# Altium PCB Tony_Tablet.PcbDoc (part 3 of 5)
Units mm, origin at the board's own origin, x right, y up, seen from the top; angles counter-clockwise.
Board outline 136.83 x 90.55 mm, 4 copper layers (Top Layer, Power, GND, Bottom Layer), stack 0.778 mm thick; 275 components, 264 nets, 1226 pads, 0 vias.
Unrouted connection lines stored in the file: 716.
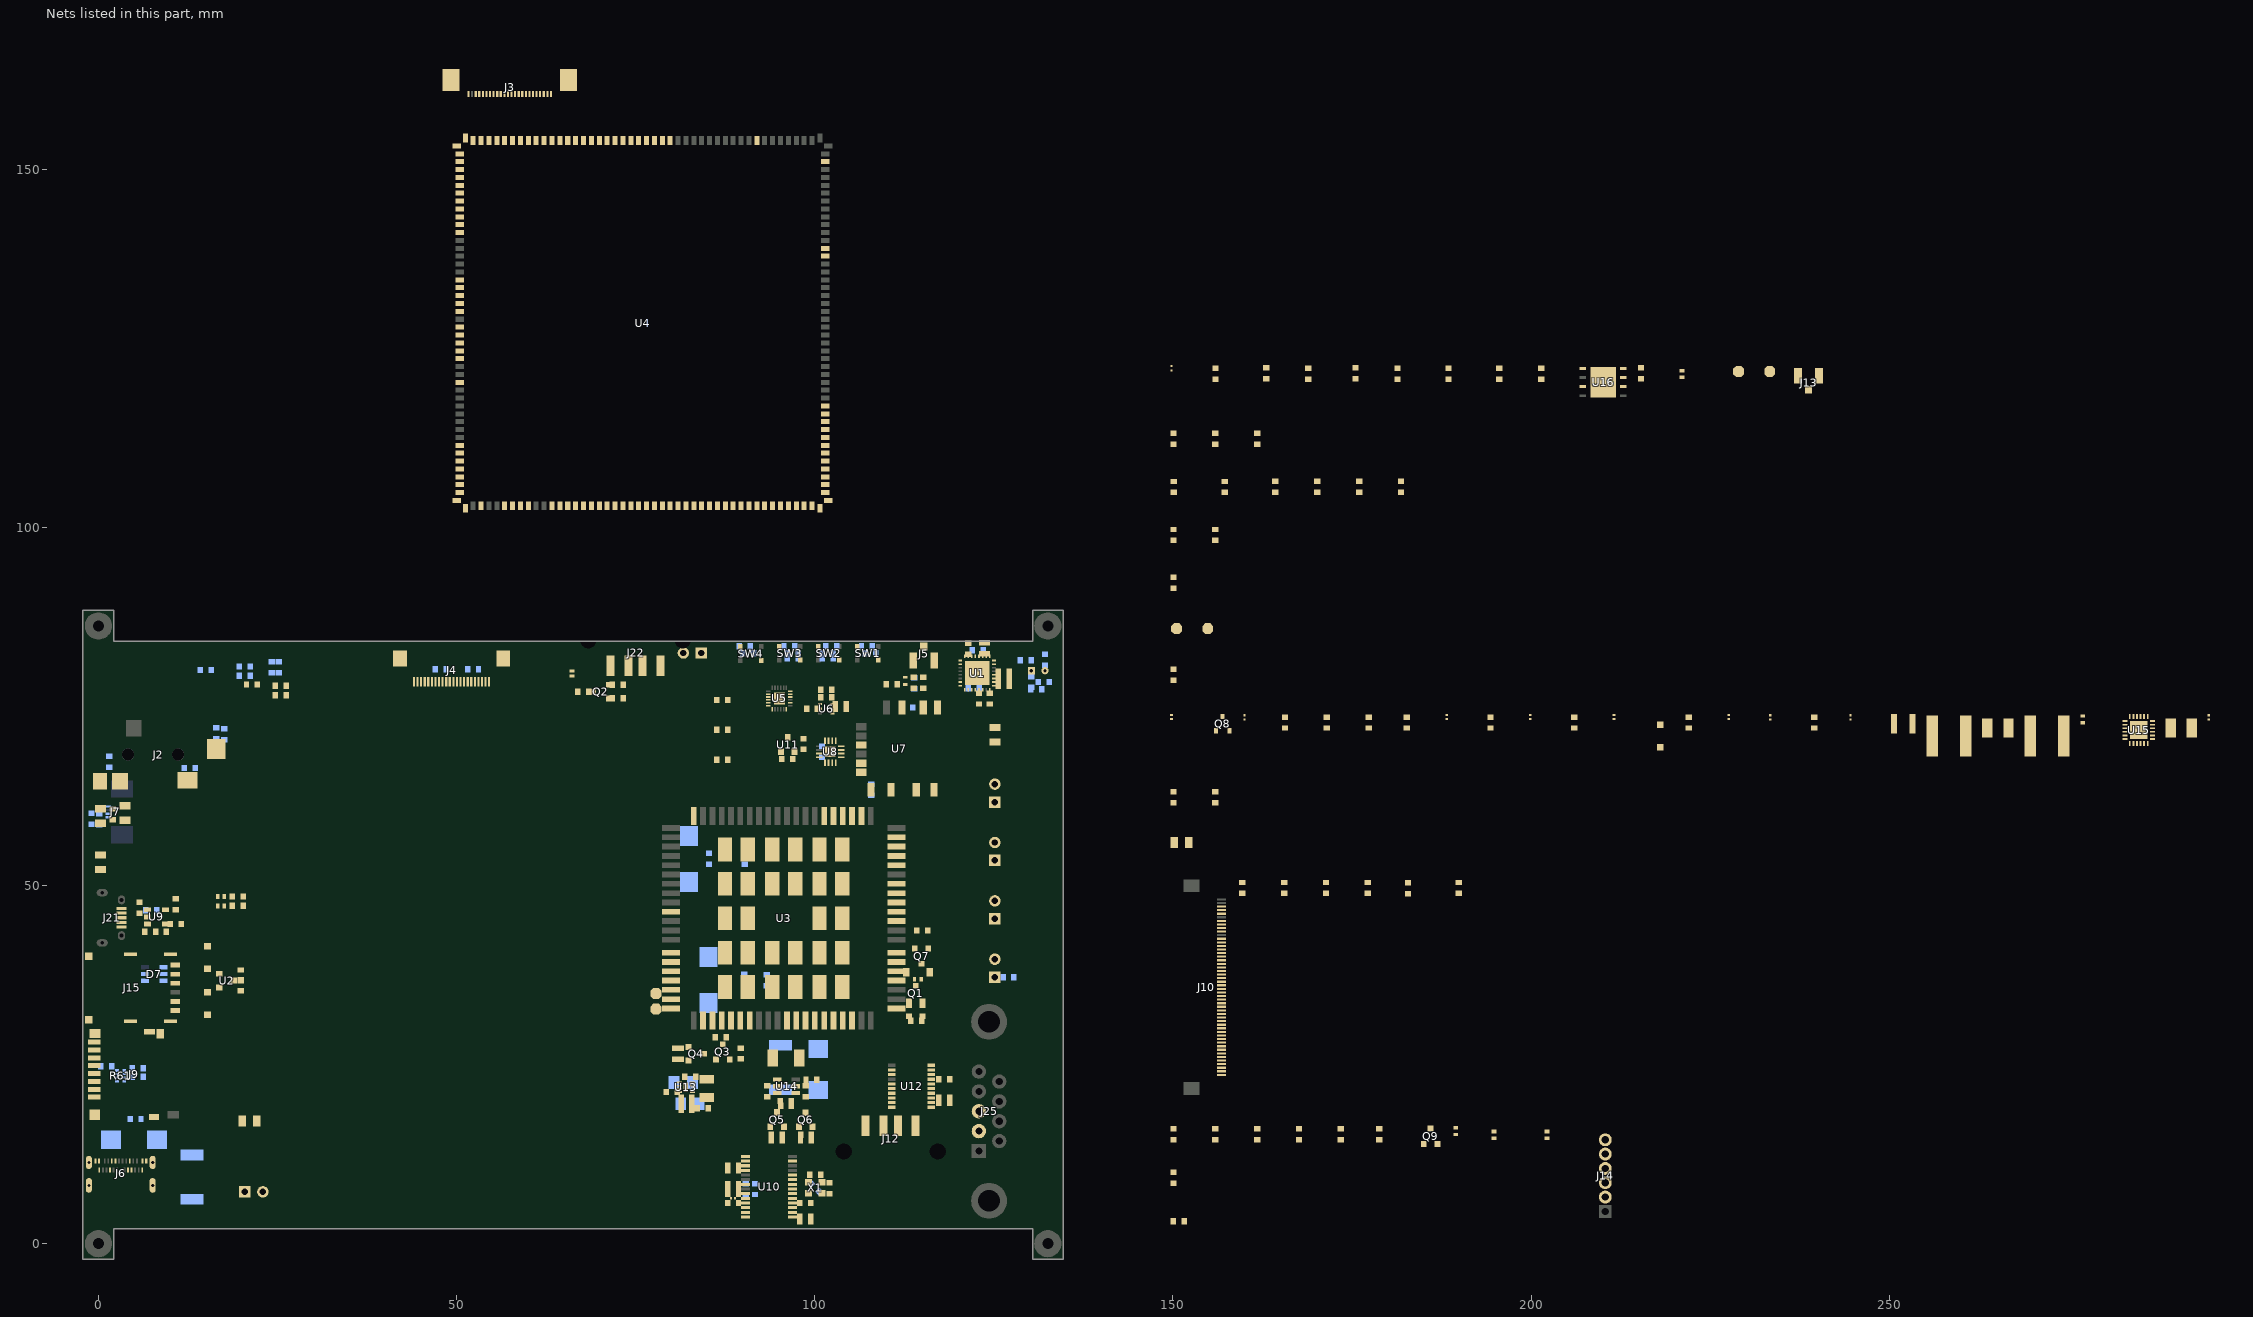
[diagram p4: the nets of this part, all layers, seen from the top]

## Part data (continued)
C84 C87: library part EMK316BBJ476ML-T, "CAP CER 47UF 16V X5R 1206", Case/Package=1206, Case Code (Metric)=3216, Manufacturer="Taiyo Yuden", Max Operating Temperature=85°C, Min Operating Temperature=-55°C, Supplier Part Number 1=587-5425-1-ND, Tolerance=20%, Voltage Rating=16V, Capacitance=47uF, Case Code (Imperial)=1206, ComponentLink1Description=http://ds.yuden.co.jp/TYCOMPAS/ut/detail.do?productNo=EMK316BBJ476ML-T&fileName=EMK316BBJ476ML-T_SS&mode=specSheetDownload&src-supplier=Digi-Key, ComponentLink1URL=http://ds.yuden.co.jp/TYCOMPAS/ut/detail.do?productNo=EMK316BBJ476ML-T&fileName=EMK316BBJ476ML-T_SS&mode=specSheetDownload&src-supplier=Digi-Key, ComponentLink2Description=http://www.farnell.com/datasheets/2819853.pdf?src-supplier=Element14, ComponentLink2URL=http://www.farnell.com/datasheets/2819853.pdf?src-supplier=Element14, ComponentLink3Description=http://www.farnell.com/datasheets/2819853.pdf?src-supplier=Farnell, ComponentLink3URL=http://www.farnell.com/datasheets/2819853.pdf?src-supplier=Farnell, ComponentLink4Description=http://www.farnell.com/datasheets/2819853.pdf?src-supplier=Newark, ComponentLink4URL=http://www.farnell.com/datasheets/2819853.pdf?src-supplier=Newark, Manufacturer Part Number=EMK316BBJ476ML-T, Mount="Surface Mount", Packaging="Tape and Reel", Pricing 1="1=0.81, 10=0.595, 100=0.408, 500=0.32304, 1000=0.27203 (USD)", Stock 1=25339, Supplier 1=Digi-Key
C86: library part CC0603JRNPO9BN220, "CAP CER 22PF 50V C0G/NPO 0603", Case Code (Imperial)=0603, Case Code (Metric)=1608, Dielectric=C0G, Insulation Resistance=10GR, Manufacturer=Yageo, Max Operating Temperature=125°C, Min Operating Temperature=-55°C, Package Quantity=1, Supplier Part Number 1=311-1062-1-ND, Temperature Coefficient=30ppm/°C, Tolerance=5%, Voltage=50V, Capacitance=22pF, Case/Package=0603, ComponentLink1Description=http://www.farnell.com/datasheets/2213336.pdf?src-supplier=Element14, ComponentLink1URL=http://www.farnell.com/datasheets/2213336.pdf?src-supplier=Element14, ComponentLink2Description=http://www.yageo.com/documents/recent/UPY-GP_NP0_16V-to-50V_16.pdf?src-supplier=Digi-Key, ComponentLink2URL=http://www.yageo.com/documents/recent/UPY-GP_NP0_16V-to-50V_16.pdf?src-supplier=Digi-Key, ComponentLink3Description=http://www.farnell.com/datasheets/1443161.pdf?src-supplier=Element14, ComponentLink3URL=http://www.farnell.com/datasheets/1443161.pdf?src-supplier=Element14, ComponentLink4Description=http://www.yageo.com/documents/recent/UPY-GP_NP0_16V-to-50V_8.pdf?src-supplier=Avnet, ComponentLink4URL=http://www.yageo.com/documents/recent/UPY-GP_NP0_16V-to-50V_8.pdf?src-supplier=Avnet, ComponentLink5Description=http://www.yageo.com/documents/recent/UPY-GP_NP0_16V-to-50V_8.pdf?src-supplier=Avnet+Europe, ComponentLink5URL=http://www.yageo.com/documents/recent/UPY-GP_NP0_16V-to-50V_8.pdf?src-supplier=Avnet+Europe, Depth=0.8mm, Height=0.8mm, Lead Free="Lead Free", Length=1.6mm, Manufacturer Part Number=CC0603JRNPO9BN220, Mount="Surface Mount", Number of Pins=2, Packaging="Tape and Reel", Pricing 1="1=0.1, 10=0.044, 100=0.0197, 500=0.0141, 1000=0.01108 (USD)", Radiation Hardening=No, REACH SVHC="No SVHC", Stock 1=221639, Supplier 1=Digi-Key, Termination=SMD/SMT, Thickness=0.035inch, Voltage Rating=50V, Voltage Rating (DC)=50V, Width=0.031inch
C90: library part T491C226K025AT, "CAP TANT 22UF 10% 25V 2312", Case/Package=Molded, Case Code (Imperial)=2412, Case Code (Metric)=6032, Dielectric Material=Tantalum, ESR (Equivalent Series Resistance)=1.4R, Leakage Current=5.5uA, Manufacturer=KEMET, Max Operating Temperature=125°C, Min Operating Temperature=-55°C, Package Quantity=1, Ripple Current=280mA, Supplier Part Number 1=399-3746-1-ND, Tolerance=10%, Voltage=25V, Capacitance=22uF, ComponentLink1Description=https://search.kemet.com/component-edge/download/datasheet/T491C226K025AT.pdf?src-supplier=Digi-Key, ComponentLink1URL=https://search.kemet.com/component-edge/download/datasheet/T491C226K025AT.pdf?src-supplier=Digi-Key, ComponentLink2Description=http://www.jameco.com/Jameco/Products/ProdDS/1573951.pdf?src-supplier=Jameco, ComponentLink2URL=http://www.jameco.com/Jameco/Products/ProdDS/1573951.pdf?src-supplier=Jameco, ComponentLink3Description=https://www.alliedelec.com/m/d/1172a60f7bb3eb66344f86e8fb9ddbde.pdf?src-supplier=Allied+Electronics, ComponentLink3URL=https://www.alliedelec.com/m/d/1172a60f7bb3eb66344f86e8fb9ddbde.pdf?src-supplier=Allied+Electronics, ComponentLink4Description=http://www.farnell.com/datasheets/1698764.pdf?src-supplier=Element14, ComponentLink4URL=http://www.farnell.com/datasheets/1698764.pdf?src-supplier=Element14, ComponentLink5Description=https://api.kemet.com/component-edge/download/datasheet/T491C226K025AT.pdf?src-supplier=Digi-Key, ComponentLink5URL=https://api.kemet.com/component-edge/download/datasheet/T491C226K025AT.pdf?src-supplier=Digi-Key, ComponentLink6Description=http://www.farnell.com/datasheets/1923792.pdf?src-supplier=Element14, ComponentLink6URL=http://www.farnell.com/datasheets/1923792.pdf?src-supplier=Element14, ComponentLink7Description=https://www.distrelec.biz/Web/Downloads/_t/ds/KEM_T2005_T491_eng_tds.pdf?mime=application%2Fpdf&src-supplier=Distrelec, ComponentLink7URL=https://www.distrelec.biz/Web/Downloads/_t/ds/KEM_T2005_T491_eng_tds.pdf?mime=application%2Fpdf&src-supplier=Distrelec, Depth=3.2mm, Dissipation Factor=6%, Features="General Purpose", Height=2.5mm, Height - Seated (Max)=0.11inch, Lead Free="Lead Free", Lead Pitch=2.9mm, Length=6mm, Life (Hours)=2000Hour, Manufacturer Part Number=T491C226K025AT, Mount="Surface Mount,PCB", Number of Pins=2, Packaging="Tape and Reel", Polarity=Polar, Pricing 1="1=0.82, 10=0.626, 100=0.4479 (USD)", Radiation Hardening=No, REACH SVHC="No SVHC", Stock 1=17993, Supplier 1=Digi-Key, Termination=SMD/SMT, Voltage Rating=25V, Voltage Rating (DC)=25V, Width=0.126inch
D1 D2: "DIODE GEN PURP 100V 300MA SOD123", Average Rectified Current=300mA, Capacitance=2pF, Current Rating=150mA, Forward Voltage=1.25V, Manufacturer=Diodes, Max Forward Surge Current (Ifsm)=2A, Max Operating Temperature=150°C, Max Repetitive Reverse Voltage (Vrrm)=100V, Min Operating Temperature=-65°C, Package Quantity=3000, Peak Reverse Current=1uA, Power Dissipation=400mW, Supplier Part Number 1=1N4148W-FDICT-ND, Voltage Rating (DC)=75V, ComponentLink1Description=https://www.diodes.com/assets/Datasheets/ds30086.pdf?src-supplier=Digi-Key, ComponentLink1URL=https://www.diodes.com/assets/Datasheets/ds30086.pdf?src-supplier=Digi-Key, ComponentLink2Description=http://www.farnell.com/datasheets/2238378.pdf?src-supplier=Element14, ComponentLink2URL=http://www.farnell.com/datasheets/2238378.pdf?src-supplier=Element14, ComponentLink3Description=http://www.mouser.com/ds/2/115/ds30086-60872.pdf?src-supplier=Mouser, ComponentLink3URL=http://www.mouser.com/ds/2/115/ds30086-60872.pdf?src-supplier=Mouser, ComponentLink4Description=https://www.diodes.com/assets/Datasheets/ds30086.pdf?src-supplier=Avnet, ComponentLink4URL=https://www.diodes.com/assets/Datasheets/ds30086.pdf?src-supplier=Avnet, ComponentLink5Description=https://www.diodes.com/assets/Datasheets/ds30086.pdf?src-supplier=Avnet+Europe, ComponentLink5URL=https://www.diodes.com/assets/Datasheets/ds30086.pdf?src-supplier=Avnet+Europe, ComponentLink6Description=https://www.diodes.com/assets/Datasheets/ds30086.pdf?src-supplier=Verical, ComponentLink6URL=https://www.diodes.com/assets/Datasheets/ds30086.pdf?src-supplier=Verical, Contact Plating=Tin,Matte, Element Configuration=Single, Forward Current=150mA, Height=1.25mm, Lead Free="Lead Free", Length=2.85mm, Manufacturer Part Number=1N4148W-7-F, Max Reverse Voltage (DC)=100V, Max Surge Current=2A, Mount="Surface Mount", Number of Pins=2, Output Current=150mA, Packaging="Tape and Reel", Peak Non-Repetitive Surge Current=2A, Polarity=Standard, Power Rating=400mW, Pricing 1="1=0.16, 10=0.146, 25=0.1388, 100=0.0611, 250=0.05868, 500=0.048, 1000=0.03333 (USD)", Radiation Hardening=No, REACH SVHC="No SVHC", Recovery Time=4ns, Reverse Recovery Time=4ns, Stock 1=3949286, Supplier 1=Digi-Key, Voltage=100V, Weight=0.000353oz, Width=1.7mm
D3: "5.1V 800mW 5uA @ 1V SOD-123FL Zener Diodes RoHS", Manufacturer="PANJIT International", Package=SOD-123FL, Manufacturer Part No=BZD27C5V1P_R1_00001
D4: "Bidirectional 3.3V (Max) 3.8V 8V 10A (8/20us) SMD TVS RoHS", Manufacturer="Bourne Semicon (Shenzhen)", Package=DFN1006, ComponentLink1Description=https://www.mouser.com/ds/2/302/PESD3V3X1BL-64229.pdf?src-supplier=Mouser, ComponentLink1URL=https://www.mouser.com/ds/2/302/PESD3V3X1BL-64229.pdf?src-supplier=Mouser, ComponentLink2Description=https://assets.nexperia.com/documents/data-sheet/PESD3V3X1BL.pdf?src-supplier=Digi-Key, ComponentLink2URL=https://assets.nexperia.com/documents/data-sheet/PESD3V3X1BL.pdf?src-supplier=Digi-Key, ComponentLink3Description=http://www.onsemi.cn/pub_link/Collateral/ESD9B-D.PDF?src-supplier=Digi-Key, ComponentLink3URL=http://www.onsemi.cn/pub_link/Collateral/ESD9B-D.PDF?src-supplier=Digi-Key, ComponentLink4Description=http://www.onsemi.com/pub/Collateral/ESD9B-D.PDF?src-supplier=Avnet+Europe, ComponentLink4URL=http://www.onsemi.com/pub/Collateral/ESD9B-D.PDF?src-supplier=Avnet+Europe, ComponentLink5Description=http://www.mouser.com/ds/2/308/ESD9B-D-479788.pdf?src-supplier=Mouser, ComponentLink5URL=http://www.mouser.com/ds/2/308/ESD9B-D-479788.pdf?src-supplier=Mouser, ComponentLink6Description=http://www.farnell.com/datasheets/1596367.pdf?src-supplier=Element14, ComponentLink6URL=http://www.farnell.com/datasheets/1596367.pdf?src-supplier=Element14, ComponentLink7Description=https://www.verical.com/server-webapp/html/getDatasheet?partID=292713&src-supplier=Verical, ComponentLink7URL=https://www.verical.com/server-webapp/html/getDatasheet?partID=292713&src-supplier=Verical, ComponentLink8Description=http://www.onsemi.com/pub/Collateral/ESD9B-D.PDF?src-supplier=Avnet, ComponentLink8URL=http://www.onsemi.com/pub/Collateral/ESD9B-D.PDF?src-supplier=Avnet, Manufacturer Part No=ESD9B3.3ST5G-N
D5: "Diode Schottky 30V 0.35A 2-Pin SOD-123 T/R", Average Rectified Current=350mA, Forward Voltage=600mV, Manufacturer=Diodes, Max Forward Surge Current (Ifsm)=1.5A, Max Operating Temperature=125°C, Max Power Dissipation=400mW, Max Repetitive Reverse Voltage (Vrrm)=30V, Max Reverse Current=5uA, Min Operating Temperature=-65°C, Package Quantity=3000, Supplier Part Number 1=SD103BW-7-FDICT-ND, Category="Rectifier Diodes", ComponentLink1Description=https://datasheet.ciiva.com/36526/1541925-36526008.pdf?src-supplier=Jameco, ComponentLink1URL=https://datasheet.ciiva.com/36526/1541925-36526008.pdf?src-supplier=Jameco, ComponentLink2Description=https://datasheet.ciiva.com/912/ds11013-912934.pdf?src-supplier=Digi-Key, ComponentLink2URL=https://datasheet.ciiva.com/912/ds11013-912934.pdf?src-supplier=Digi-Key, ComponentLink3Description=https://datasheet.ciiva.com/912/ds11013-912935.pdf?src-supplier=Digi-Key, ComponentLink3URL=https://datasheet.ciiva.com/912/ds11013-912935.pdf?src-supplier=Digi-Key, ComponentLink4Description=https://datasheet.ciiva.com/16574/ds11013-16574365.pdf?src-supplier=Avnet+Europe, ComponentLink4URL=https://datasheet.ciiva.com/16574/ds11013-16574365.pdf?src-supplier=Avnet+Europe, ComponentLink5Description=https://datasheet.ciiva.com/22695/480042-22695847.pdf?src-supplier=Element14, ComponentLink5URL=https://datasheet.ciiva.com/22695/480042-22695847.pdf?src-supplier=Element14, ComponentLink6Description=https://datasheet.ciiva.com/7964/ds11013-7964329.pdf?src-supplier=Element14, ComponentLink6URL=https://datasheet.ciiva.com/7964/ds11013-7964329.pdf?src-supplier=Element14, Element Configuration=Single, Forward Current=350mA, Height=1.25mm, Lead Free="Lead Free", Length=2.85mm, Manufacturer Part Number=SD103BW-7-F, Max Reverse Voltage (DC)=30V, Mount="Surface Mount", Number of Pins=2, Packaging="Tape and Reel", Peak Non-Repetitive Surge Current=1.5A, Power Dissipation=400mW, Power Rating=400mW, Pricing 1="1=0.44000, 10=0.32400, 100=0.18340, 500=0.12144, 1000=0.09310 (USD)", Radiation Hardening=No, REACH SVHC="No SVHC", Reverse Recovery Time=10ns, RoHS=Yes, RoHS Compliant=Yes, Series=-, Stock 1=2033, Supplier 1=Digi-Key, Termination=SMD/SMT, Weight=0.000353oz, Width=1.7mm
D6 D12: "DIODE SCHOTTKY 40V 3A DO214AB", Average Rectified Current=3A, Case/Package=SMC, Forward Voltage=500mV, Manufacturer="Vishay Semiconductors", Max Forward Surge Current (Ifsm)=100A, Max Operating Temperature=125°C, Max Repetitive Reverse Voltage (Vrrm)=40V, Max Reverse Current=500uA, Min Operating Temperature=-55°C, Package Quantity=1, Category="Rectifier Diodes", Contact Plating=Tin,Matte, Current=3A, Current Rating=3A, Element Configuration=Single, Forward Current=3A, Height=2.417mm, Lead Free="Lead Free", Length=7.11mm, Manufacturer Part Number=SS34-E3/57T, Max Reverse Leakage Current=500uA, Max Reverse Voltage (DC)=40V, Max Surge Current=100A, Mount="Surface Mount", Number of Pins=2, Output Current=3A, Packaging="Tape and Reel", Peak Non-Repetitive Surge Current=100A, Polarity=Standard, Pricing 1="850=0.23754, 1700=0.19495, 3400=0.19341, 5100=0.19188, 6800=0.19034, 8500=0.18881, 85000=0.18727 (USD)", Radiation Hardening=No, REACH SVHC=Unknown, RoHS=Yes, Stock 1=850, Supplier 1=Avnet, Supplier Part Number 1=SS34-E3/57T, Voltage=40V, Voltage Rating (DC)=40V, Width=6.22mm
D7: "TVS DIODE 3V SOT23-6", Breakdown Voltage=6.1V, Capacitance=50pF, Case/Package=SOT-23, Clamping Voltage=11.35V, Leakage Current=1uA, Manufacturer=STMicroelectronics, Max Breakdown Voltage=7.2V, Max Operating Temperature=125°C, Max Power Dissipation=100W, Min Operating Temperature=-40°C, Operating Supply Voltage=3V, Package Quantity=1, Peak Pulse Current=15A, Power Line Protection=No, Resistor Type=Zener, Supplier Part Number 1=497-7747-1-ND, Test Current=1mA, Category="TVS Diodes", ComponentLink1Description=https://datasheet.ciiva.com/5782/453742-5782854.pdf?src-supplier=Farnell, ComponentLink1URL=https://datasheet.ciiva.com/5782/453742-5782854.pdf?src-supplier=Farnell, ComponentLink2Description=https://datasheet.ciiva.com/15143/getdatasheetpartid-146092-15143750.pdf?src-supplier=Verical, ComponentLink2URL=https://datasheet.ciiva.com/15143/getdatasheetpartid-146092-15143750.pdf?src-supplier=Verical, ComponentLink3Description=https://datasheet.ciiva.com/16210/cd00005102-16210854.pdf?src-supplier=Future+Electronics, ComponentLink3URL=https://datasheet.ciiva.com/16210/cd00005102-16210854.pdf?src-supplier=Future+Electronics, ComponentLink4Description=https://datasheet.ciiva.com/14161/esda6v1l-st-eng-tds-14161530.pdf?src-supplier=Distrelec, ComponentLink4URL=https://datasheet.ciiva.com/14161/esda6v1l-st-eng-tds-14161530.pdf?src-supplier=Distrelec, ComponentLink5Description=https://datasheet.ciiva.com/4507/cd00005102-58005-4507934.pdf?src-supplier=Mouser, ComponentLink5URL=https://datasheet.ciiva.com/4507/cd00005102-58005-4507934.pdf?src-supplier=Mouser, ComponentLink6Description=https://datasheet.ciiva.com/338/cd00005102-338720.pdf?src-supplier=Digi-Key, ComponentLink6URL=https://datasheet.ciiva.com/338/cd00005102-338720.pdf?src-supplier=Digi-Key, ComponentLink7Description=https://datasheet.ciiva.com/22695/453742-22695670.pdf?src-supplier=Element14, ComponentLink7URL=https://datasheet.ciiva.com/22695/453742-22695670.pdf?src-supplier=Element14, ComponentLink8Description=https://datasheet.ciiva.com/7662/453742-7662123.pdf?src-supplier=Element14, ComponentLink8URL=https://datasheet.ciiva.com/7662/453742-7662123.pdf?src-supplier=Element14, ComponentLink9Description=https://datasheet.ciiva.com/1276/453742-1276863.pdf?src-supplier=Element14, ComponentLink9URL=https://datasheet.ciiva.com/1276/453742-1276863.pdf?src-supplier=Element14, ComponentLink10Description=https://datasheet.ciiva.com/41443/001184254-da-01-en-transil-array-esda6v1-5sc6-sot-23-6-stm-41443467.pdf?src-supplier=Conrad, ComponentLink10URL=https://datasheet.ciiva.com/41443/001184254-da-01-en-transil-array-esda6v1-5sc6-sot-23-6-stm-41443467.pdf?src-supplier=Conrad, Depth=1.75mm, Diode Type=ZENER, Direction=Unidirectional, Element Configuration="Common Anode", ESD Protection=Yes, Height=1.3mm, Lead Free="Lead Free", Length=3.05mm, Manufacturer Part Number=ESDA6V1-5SC6, Max Reverse Leakage Current=1uA, Min Breakdown Voltage=6.1V, Mount="Surface Mount", Number of Channels=5, Number of Elements=5, Number of Pins=6, Number of Unidirectional Channels=5, Packaging="Tape and Reel", Peak Pulse Power=100W, Polarity=Unidirectional, Pricing 1="1=0.46000, 10=0.39400, 100=0.27370, 500=0.21368, 1000=0.17378 (USD)", Radiation Hardening=No, REACH SVHC="No SVHC", Reverse Breakdown Voltage=6.1V, Reverse Standoff Voltage=3V, RoHS=Yes, RoHS Compliant=Yes, Series="ESDA, TRANSIL™", Stock 1=10768, Supplier 1=Digi-Key, Termination=SMD/SMT, Voltage Rating (DC)=6.1V, Width=1.75mm, Working Voltage=3V
J1 J8 J11 J26: library part "SMD PAD"
J2: "CONN JACK 4COND 3.5MM SMD R/A", Body Color=Black, Case/Package=SMD/SMT, Current Rating=1A, Manufacturer=CUI, Supplier Part Number 1=CP-43515TSSJCT-ND, Category=Connectors, Color=Black, ComponentLink1Description=https://datasheet.ciiva.com/7368/sj-4351x-smt-series-7368789.pdf?src-supplier=Digi-Key, ComponentLink1URL=https://datasheet.ciiva.com/7368/sj-4351x-smt-series-7368789.pdf?src-supplier=Digi-Key, ComponentLink2Description=https://datasheet.ciiva.com/7368/sj-4351x-smt-series-7368776.pdf?src-supplier=Digi-Key, ComponentLink2URL=https://datasheet.ciiva.com/7368/sj-4351x-smt-series-7368776.pdf?src-supplier=Digi-Key, ComponentLink3Description=https://datasheet.ciiva.com/16215/sj-4351x-smt-series-16215052.pdf?src-supplier=Future+Electronics, ComponentLink3URL=https://datasheet.ciiva.com/16215/sj-4351x-smt-series-16215052.pdf?src-supplier=Future+Electronics, Connector Type=Jack, Contact Plating=Silver, Gender=Female, Lead Free="Lead Free", Manufacturer Part Number=SJ-43515TS-SMT-TR, Mount="Surface Mount", Number of Conductors=4, Number of Ports=1, Orientation=Horizontal, Packaging="Cut Tape", Pricing 1="1=1.07000, 10=0.90600, 25=0.86960, 50=0.85100, 100=0.81400, 250=0.74000, 500=0.66600 (USD)", RoHS=Yes, RoHS Compliant=Yes, Series=SJ, Shielding=Unshielded, Stock 1=51087, Supplier 1=Digi-Key, Termination=Solder
J3: "CONN FFC TOP 24POS 0.50MM R/A", Current Rating=500mA, Manufacturer=Molex, Manufacturer Part Number=52435-2471, Max Operating Temperature=85°C, Max Voltage Rating (AC)=50V, Max Voltage Rating (DC)=5.05kV, Min Operating Temperature=-40°C, Package Quantity=1000, Supplier Part Number 1=WM7975CT-ND, Category="FFC / FPC", ComponentLink1Description=https://datasheet.ciiva.com/1484/1629121-1484657.pdf?src-supplier=Newark, ComponentLink1URL=https://datasheet.ciiva.com/1484/1629121-1484657.pdf?src-supplier=Newark, ComponentLink2Description=https://datasheet.ciiva.com/5137/0524352471-ffc-fpc-connectors-170593-5137745.pdf?src-supplier=Mouser, ComponentLink2URL=https://datasheet.ciiva.com/5137/0524352471-ffc-fpc-connectors-170593-5137745.pdf?src-supplier=Mouser, ComponentLink3Description=https://datasheet.ciiva.com/30088/283130524352471-ffc-fpc-nectors-30088679.pdf?src-supplier=Onlinecomponents.com, ComponentLink3URL=https://datasheet.ciiva.com/30088/283130524352471-ffc-fpc-nectors-30088679.pdf?src-supplier=Onlinecomponents.com, ComponentLink4Description=https://datasheet.ciiva.com/3925/128320524352471-ffc-fpc-nectors-3925353.pdf?src-supplier=Arrow+Electronics, ComponentLink4URL=https://datasheet.ciiva.com/3925/128320524352471-ffc-fpc-nectors-3925353.pdf?src-supplier=Arrow+Electronics, ComponentLink5Description=https://datasheet.ciiva.com/16659/0524352471-ffc-fpc-connectors-16659957.pdf?src-supplier=Avnet+Europe, ComponentLink5URL=https://datasheet.ciiva.com/16659/0524352471-ffc-fpc-connectors-16659957.pdf?src-supplier=Avnet+Europe, ComponentLink6Description=https://datasheet.ciiva.com/8038/1597798-8038390.pdf?src-supplier=Element14, ComponentLink6URL=https://datasheet.ciiva.com/8038/1597798-8038390.pdf?src-supplier=Element14, ComponentLink7Description=https://datasheet.ciiva.com/10364/0524352471-ffc-fpc-connectors-10364236.pdf?src-supplier=Avnet, ComponentLink7URL=https://datasheet.ciiva.com/10364/0524352471-ffc-fpc-connectors-10364236.pdf?src-supplier=Avnet, Contact Location=Top, Contact Material=Bronze, Contact Plating=Gold, Depth=4.7mm, Gender=Receptacle, Housing Material=Nylon, Length=18.6mm, Number of Circuits=24, Number of Contacts=24, Number of Positions=24, Number of Rows=1, Orientation="Right Angle", Packaging="Tape and Reel", Pitch=0.5mm, Pricing 1="1=2.22000, 10=1.89200, 100=1.56290 (USD)", Radiation Hardening=No, REACH SVHC=Unknown, RoHS=Yes, Stackable=No, Stock 1=1377, Supplier 1=Digi-Key, Termination=Solder, Voltage Rating=50V
J4: "CONN FFC 22POS 0.50MM SMD", Manufacturer=Hirose, Supplier Part Number 1=26-TF31-22S-0.5SH(800)CT-ND, Manufacturer Part Number=TF31-22S-0.5SH(800), Pricing 1="1=0.46000, 10=0.43100, 25=0.36920, 50=0.31360, 100=0.30140, 250=0.27060, 500=0.25830, 1000=0.21525 (USD)", RoHS=Yes, RoHS Compliant=No, Stock 1=14399, Supplier 1=Digi-Key
J5 J13: "CONN U.FL RCPT STR 50 OHM SMD", Case/Package=SMD/SMT, Manufacturer=Hirose, Package Quantity=10000, Supplier Part Number 1=U.FL-R-SMT-1(80)-CUTT, ComponentLink1Description=https://www.hirose.com/product/en/download_file/key_name/U.FL-R-SMT-1%2880%29/category/Specification%20Sheet/doc_file_id/37638/?file_category_id=9&item_id=03310472280&is_series=&src-supplier=Digi-Key, ComponentLink1URL=https://www.hirose.com/product/en/download_file/key_name/U.FL-R-SMT-1%2880%29/category/Specification%20Sheet/doc_file_id/37638/?file_category_id=9&item_id=03310472280&is_series=&src-supplier=Digi-Key, ComponentLink2Description=http://www.mouser.com/ds/2/185/U.FL_catalog-939761.pdf?src-supplier=Mouser, ComponentLink2URL=http://www.mouser.com/ds/2/185/U.FL_catalog-939761.pdf?src-supplier=Mouser, Lead Free="Lead Free", Manufacturer Part Number=U.FL-R-SMT-1(80), Packaging="Tape and Reel", Pricing 1="1=1.07, 500=0.785, 1500=0.74, 2500=0.72, 5000=0.695 (USD)", Stock 1=1272, Supplier 1="Future Electronics"
J6: "CONN RCP USB3.1 TYPEC 24P SMD RA", Current Rating=1.25A, Flammability Rating="UL94 V-0", Insulation Color=Black, Manufacturer="TE Connectivity AMP", Max Operating Temperature=85°C, Min Operating Temperature=-40°C, Ratings=Waterproof, Supplier Part Number 1=A132569CT-ND, Voltage Rating=30V, Category="USB Connectors", ComponentLink1Description=http://www.farnell.com/datasheets/2611889.pdf?src-supplier=Farnell, ComponentLink1URL=http://www.farnell.com/datasheets/2611889.pdf?src-supplier=Farnell, ComponentLink2Description=https://www.te.com/commerce/DocumentDelivery/DDEController?Action=srchrtrv&DocNm=2305018&DocType=Customer+Drawing&DocLang=English&src-supplier=Digi-Key, ComponentLink2URL=https://www.te.com/commerce/DocumentDelivery/DDEController?Action=srchrtrv&DocNm=2305018&DocType=Customer+Drawing&DocLang=English&src-supplier=Digi-Key, ComponentLink3Description=http://www.farnell.com/datasheets/2611889.pdf?src-supplier=Newark, ComponentLink3URL=http://www.farnell.com/datasheets/2611889.pdf?src-supplier=Newark, Connector Type=USB, Contact Plating=Gold, Gender=Receptacle, Manufacturer Part Number=2305018-2, Mount="Surface Mount,Through Hole", Number of Contacts=24, Number of Ports=1, Packaging="Tape and Reel", Pricing 1="1=3.00000, 10=2.87800, 25=2.63840, 50=2.51840, 100=2.39840, 250=2.09864 (USD)", RoHS=Yes, RoHS Compliant=Yes, Shielding=Shielded, Stock 1=4590, Supplier 1=Digi-Key, Termination=Solder
J7: "CONN FFC BOTTOM 4POS 0.50MM R/A", Actuator Color=Brown, Contact Resistance=20mR, Current Rating=500mA, Flammability Rating="UL94 V-0", Housing Color=Natural, Manufacturer=Molex, Manufacturer Part Number=52746-0471, Max Operating Temperature=85°C, Min Operating Temperature=-20°C, Package Quantity=1, Supplier Part Number 1=WM6768CT-ND, Voltage Rating=50V, Actuator Material=Glass,Polyphenylene, Category="FFC / FPC", ComponentLink1Description=https://datasheet.ciiva.com/8038/1597791-8038563.pdf?src-supplier=Element14, ComponentLink1URL=https://datasheet.ciiva.com/8038/1597791-8038563.pdf?src-supplier=Element14, ComponentLink2Description=https://datasheet.ciiva.com/11745/0900766b80dfdcc6-11745365.pdf?src-supplier=RSComponents, ComponentLink2URL=https://datasheet.ciiva.com/11745/0900766b80dfdcc6-11745365.pdf?src-supplier=RSComponents, ComponentLink3Description=https://datasheet.ciiva.com/15176/getdatasheetpartid-367391-15176714.pdf?src-supplier=Verical, ComponentLink3URL=https://datasheet.ciiva.com/15176/getdatasheetpartid-367391-15176714.pdf?src-supplier=Verical, Contact Location=Bottom, Contact Material=Bronze, Contact Plating=Gold, Depth=4.3mm, Gender=Receptacle, Housing Material=Nylon, Length=8.1mm, Mating Cycles=20, Mount="Surface Mount", Number of Contacts=4, Number of Positions=4, Number of Rows=1, Orientation="Right Angle", Packaging="Tape and Reel", Pitch=0.5mm, Pricing 1="1=0.76000, 10=0.64000, 100=0.49810 (USD)", Radiation Hardening=No, REACH SVHC=Unknown, RoHS=Yes, RoHS Compliant=Yes, Series="Easy-On™ 52746", Stock 1=213, Supplier 1=Digi-Key, Termination=Solder, Wire/Cable Type=Straight
J9: "CONN MICRO SD CARD PUSH-PULL R/A", Manufacturer="AMPHENOL ICC (COMMERCIAL PRODUCTS)", Supplier Part Number 1=114-00841-68-6-ND, Connector Type=Connector, Contact Plating=Gold, Manufacturer Part Number=114-00841-68, Mount="Surface Mount", Packaging="Tape and Reel", Pricing 1="1=1.32, 10=1.194, 25=1.1208, 50=1.0722, 100=1.0235, 250=0.926, 500=0.8529 (USD)", Stock 1=29968, Supplier 1=Digi-Key
J10: "Conn FFC/FPC 50 POS 0.5mm  SMD T/R", Color=Beige,Brown, Contact Resistance=50mR, Current Rating=500mA, Flammability Rating="UL94 V-0", Housing Color=Beige, Insulation Resistance=500MR, Manufacturer=Hirose, Max Current Rating=400mA, Max Operating Temperature=70°C, Max Voltage Rating (AC)=50V, Min Operating Temperature=-40°C, Package Quantity=2000, Supplier Part Number 1=HFK150CT-ND, Actuator Material=Polyphenylene, Category="FFC / FPC", ComponentLink1Description=https://datasheet.ciiva.com/14667/0900766b80806912-14667338.pdf?src-supplier=RSComponents, ComponentLink1URL=https://datasheet.ciiva.com/14667/0900766b80806912-14667338.pdf?src-supplier=RSComponents, ComponentLink2Description=https://datasheet.ciiva.com/11745/0900766b80d985fc-11745058.pdf?src-supplier=RSComponents, ComponentLink2URL=https://datasheet.ciiva.com/11745/0900766b80d985fc-11745058.pdf?src-supplier=RSComponents, ComponentLink3Description=https://datasheet.ciiva.com/15176/getdatasheetpartid-447852-15176863.pdf?src-supplier=Verical, ComponentLink3URL=https://datasheet.ciiva.com/15176/getdatasheetpartid-447852-15176863.pdf?src-supplier=Verical, ComponentLink4Description=https://datasheet.ciiva.com/7989/58809-7989413.pdf?src-supplier=Element14, ComponentLink4URL=https://datasheet.ciiva.com/7989/58809-7989413.pdf?src-supplier=Element14, ComponentLink5Description=https://datasheet.ciiva.com/5137/ed-fh12-20140305-355586-5137621.pdf?src-supplier=Mouser, ComponentLink5URL=https://datasheet.ciiva.com/5137/ed-fh12-20140305-355586-5137621.pdf?src-supplier=Mouser, Contact Location=Top, Contact Material=Bronze, Contact Plating=Gold, Depth=6.2mm, Gender=Female, Housing Material=Polyamide, Lead Free="Lead Free", Lead Pitch=0.5mm, Length=29.5mm, Manufacturer Part Number=FH12A-50S-0.5SH(55), Material=Polyamide, Mating Cycles=20, Mount="Surface Mount", Number of Contacts=50, Number of Positions=50, Number of Rows=1, Orientation="Right Angle", Packaging="Tape and Reel", Pitch=0.5mm, Pricing 1="1=3.00000, 10=2.88000, 25=2.64000, 50=2.52000, 100=2.40000, 250=2.10000, 500=2.04000, 1000=1.74000 (USD)", Radiation Hardening=No, REACH SVHC="No SVHC", RoHS=Yes, Supplier 1=Digi-Key, Termination=Solder, Voltage Rating=50V, Voltage Rating (AC)=50V, Width=29.1mm, Wire/Cable Type=Straight
J12 J22: "USB Connectors 4P RECEPTACLE TYPE A", Color=White, Contact Resistance=30mR, Current Rating=1A, Flammability Rating="UL94 V-0", Insulation Resistance=1GR, Manufacturer="Amphenol FCI", Max Operating Temperature=40°C, Min Operating Temperature=0°C, Package Quantity=42, Supplier Part Number 1=70236897, Body Plating=Nickel, Category=Connectors, ComponentLink1Description=https://datasheet.ciiva.com/851/87583-851211.pdf?src-supplier=Digi-Key, ComponentLink1URL=https://datasheet.ciiva.com/851/87583-851211.pdf?src-supplier=Digi-Key, ComponentLink2Description=https://datasheet.ciiva.com/1100/57319-1100818.pdf?src-supplier=Newark, ComponentLink2URL=https://datasheet.ciiva.com/1100/57319-1100818.pdf?src-supplier=Newark, ComponentLink3Description=https://datasheet.ciiva.com/25614/0900766b8118e6e2-25614557.pdf?src-supplier=RSComponents, ComponentLink3URL=https://datasheet.ciiva.com/25614/0900766b8118e6e2-25614557.pdf?src-supplier=RSComponents, ComponentLink4Description=https://datasheet.ciiva.com/4599/gs-12-095-532824-4599287.pdf?src-supplier=Mouser, ComponentLink4URL=https://datasheet.ciiva.com/4599/gs-12-095-532824-4599287.pdf?src-supplier=Mouser, ComponentLink5Description=https://datasheet.ciiva.com/15181/getdatasheetpartid-106468-15181159.pdf?src-supplier=Verical, ComponentLink5URL=https://datasheet.ciiva.com/15181/getdatasheetpartid-106468-15181159.pdf?src-supplier=Verical, ComponentLink6Description=https://datasheet.ciiva.com/3094/87583-3094440.pdf?src-supplier=Avnet, ComponentLink6URL=https://datasheet.ciiva.com/3094/87583-3094440.pdf?src-supplier=Avnet, ComponentLink7Description=https://datasheet.ciiva.com/14619/70236897-14619037.pdf?src-supplier=Allied+Electronics, ComponentLink7URL=https://datasheet.ciiva.com/14619/70236897-14619037.pdf?src-supplier=Allied+Electronics, Connector Type=USB,Receptacle, Contact Material="Copper Alloy", Contact Plating=GXT,Gold, Depth=14mm, Gender=Receptacle, Housing Material=Thermoplastic, Interface=USB, Length=14.5mm, Manufacturer Part Number=87583-2010BLF, Material=Tin, Mating Cycles=1500, Mount="Surface Mount,Horizontal", Number of Contacts=4, Number of Ports=1, Number of Positions=4, Number of Terminals/Pins=4, Orientation="Right Angle", Packaging=Rail/Tube, Plating=Nickel, Radiation Hardening=No, REACH SVHC="No SVHC", RoHS=Yes, RoHS Compliant=Yes, Series=87583, Supplier 1="Allied Electronics", Termination=Solder, USB Standard="USB 2.0"
J14: "CONN HEADER VERT 6POS 2MM", Color=Natural, Contact Resistance=20mR, Current Rating=2A, Housing Color=White, Insulation Resistance=1MR, Manufacturer=JST, Max Operating Temperature=85°C, Max Voltage Rating (AC)=100V, Min Operating Temperature=-25°C, Supplier Part Number 1=455-1708-ND, Category=Connectors, ComponentLink1Description=https://datasheet.ciiva.com/11747/0900766b8082f554-11747368.pdf?src-supplier=RSComponents, ComponentLink1URL=https://datasheet.ciiva.com/11747/0900766b8082f554-11747368.pdf?src-supplier=RSComponents, ComponentLink2Description=https://datasheet.ciiva.com/712/eph-712563.pdf?src-supplier=Digi-Key, ComponentLink2URL=https://datasheet.ciiva.com/712/eph-712563.pdf?src-supplier=Digi-Key, ComponentLink3Description=https://datasheet.ciiva.com/26894/getdatasheetpartid-639917-26894487.pdf?src-supplier=Verical, ComponentLink3URL=https://datasheet.ciiva.com/26894/getdatasheetpartid-639917-26894487.pdf?src-supplier=Verical, ComponentLink4Description=https://datasheet.ciiva.com/20207/523648-20207241.pdf?src-supplier=Rapid+Electronics, ComponentLink4URL=https://datasheet.ciiva.com/20207/523648-20207241.pdf?src-supplier=Rapid+Electronics, ComponentLink5Description=https://datasheet.ciiva.com/8052/80560-8052027.pdf?src-supplier=Element14, ComponentLink5URL=https://datasheet.ciiva.com/8052/80560-8052027.pdf?src-supplier=Element14, Connector Type="Male Pin", Contact Material=Tin,Brass, Contact Mating Length=0.13inch, Contact Plating=Tin,Copper, Depth=4.5mm, Fastening Type=Detent, Gender=Male, Height=9.4mm, Housing Material=Polyamide, Lead Free="Lead Free", Lead Pitch=2mm, Length=13.9mm, Manufacturer Part Number=B6B-PH-K-S(LF)(SN), Max Current Rating=2A, Mount="Through Hole", Number of Contacts=6, Number of Pins=6, Number of Poles=6, Number of Positions=6, Number of Rows=1, Orientation=Straight, Packaging=Bulk, Pitch=2mm, Pricing 1="1=0.33000, 10=0.31300, 100=0.21940, 500=0.18808, 1000=0.15674, 5000=0.13435, 10000=0.12539 (USD)", REACH SVHC="No SVHC", RoHS=Yes, Stock 1=6509, Supplier 1=Digi-Key, Termination=Solder, Voltage Rating=100V, Voltage Rating (AC)=100V, Width=4.5mm, Working Voltage=100V
J15: "CONN SMART CARD PUSH-PULL", Manufacturer="Wurth Electronics", Supplier Part Number 1=732-5954-1-ND, Connector Type=Connector, Contact Material="Copper Alloy", Contact Plating=Gold, Features=Shielded, Lead Free="Lead Free", Manufacturer Part Number=693043020611, Mount="Surface Mount", Number of Contacts=6, Number of Pins=6, Number of Positions=6, Packaging="Tape and Reel", Pricing 1="1=1.69, 10=1.663, 50=1.54, 100=1.417, 500=1.232 (USD)", REACH SVHC=Unknown, Stock 1=21915, Supplier 1=Digi-Key
J16 J17 J18 J19 J20 J23: "CONN HEADER R/A 2POS 2.5MM", Color=Natural, Contact Resistance=20mR, Current Rating=3A, Housing Color=White, Insulation Resistance=1GR, Manufacturer=JST, Max Operating Temperature=85°C, Max Voltage Rating (AC)=250V, Min Operating Temperature=-25°C, Package Quantity=1000, Supplier Part Number 1=455-2257-ND, Category="Headers and Wire Housings", ComponentLink1Description=https://datasheet.ciiva.com/16208/s2b-xh-alfsn-16208978.pdf?src-supplier=Future+Electronics, ComponentLink1URL=https://datasheet.ciiva.com/16208/s2b-xh-alfsn-16208978.pdf?src-supplier=Future+Electronics, ComponentLink2Description=https://datasheet.ciiva.com/8052/1684882-8052211.pdf?src-supplier=Element14, ComponentLink2URL=https://datasheet.ciiva.com/8052/1684882-8052211.pdf?src-supplier=Element14, ComponentLink3Description=https://datasheet.ciiva.com/11746/0900766b8082f560-11746947.pdf?src-supplier=RSComponents, ComponentLink3URL=https://datasheet.ciiva.com/11746/0900766b8082f560-11746947.pdf?src-supplier=RSComponents, ComponentLink4Description=https://datasheet.ciiva.com/26894/getdatasheetpartid-640270-26894603.pdf?src-supplier=Verical, ComponentLink4URL=https://datasheet.ciiva.com/26894/getdatasheetpartid-640270-26894603.pdf?src-supplier=Verical, ComponentLink5Description=https://datasheet.ciiva.com/26924/getdatasheetpartid-645395-26924076.pdf?src-supplier=Verical, ComponentLink5URL=https://datasheet.ciiva.com/26924/getdatasheetpartid-645395-26924076.pdf?src-supplier=Verical, ComponentLink6Description=https://datasheet.ciiva.com/26894/getdatasheetpartid-441330-26894909.pdf?src-supplier=Verical, ComponentLink6URL=https://datasheet.ciiva.com/26894/getdatasheetpartid-441330-26894909.pdf?src-supplier=Verical, ComponentLink7Description=https://datasheet.ciiva.com/726/exh-726412.pdf?src-supplier=Digi-Key, ComponentLink7URL=https://datasheet.ciiva.com/726/exh-726412.pdf?src-supplier=Digi-Key, ComponentLink8Description=https://datasheet.ciiva.com/20207/523653-20207183.pdf?src-supplier=Rapid+Electronics, ComponentLink8URL=https://datasheet.ciiva.com/20207/523653-20207183.pdf?src-supplier=Rapid+Electronics, Connector Type="Male Pin", Contact Material=Brass, Contact Plating=Tin,Copper,Lead, Depth=11.5mm, Gender=Male, Housing Material=Polyamide, Lead Free="Lead Free", Lead Pitch=2.5mm, Length=7.4mm, Manufacturer Part Number=S2B-XH-A(LF)(SN), Max Current Rating=3A, Max Voltage Rating (DC)=250V, Mount="Through Hole", Number of Contacts=2, Number of Positions=2, Number of Rows=1, Orientation="Right Angle", Packaging=Bulk, Pitch=2.5mm, Pricing 1="1=0.17000, 10=0.16200, 100=0.11260, 500=0.09524, 1000=0.07792, 5000=0.06927, 10000=0.06277 (USD)", REACH SVHC="No SVHC", RoHS=Yes, Stock 1=44898, Supplier 1=Digi-Key, Termination=Press-Fit, Voltage Rating=250V, Voltage Rating (AC)=250V, Wire/Cable Gauge=22AWG
J21: "USB - Micro B Female USB 2 5 SMD USB Connectors RoHS", Color=Black, Current Rating=1.8A, Flammability Rating="UL94 V-0", Insulation Resistance=1GR, Manufacturer="Amphenol FCI", Max Operating Temperature=85°C, Max Voltage Rating (AC)=100V, Min Operating Temperature=-55°C, Package Quantity=9600, Supplier Part Number 1=609-4618-1-ND, ComponentLink1Description=http://www.amphenol-icc.com/media/wysiwyg/files/drawing/10118194.pdf?src-supplier=Digi-Key, ComponentLink1URL=http://www.amphenol-icc.com/media/wysiwyg/files/drawing/10118194.pdf?src-supplier=Digi-Key, ComponentLink2Description=https://cdn.amphenol-icc.com/media/wysiwyg/files/drawing/10118194.pdf?src-supplier=Mouser, ComponentLink2URL=https://cdn.amphenol-icc.com/media/wysiwyg/files/drawing/10118194.pdf?src-supplier=Mouser, ComponentLink3Description=https://cdn.amphenol-icc.com/media/wysiwyg/files/drawing/10118194.pdf?src-supplier=Verical, ComponentLink3URL=https://cdn.amphenol-icc.com/media/wysiwyg/files/drawing/10118194.pdf?src-supplier=Verical, Connector Type=USB,Receptacle, Contact Material="Copper Alloy", Contact Plating=Gold, Depth=5mm, Features=Shielded, Gender=Receptacle, Housing Material=Polymer, Lead Free="Lead Free", Length=8.05mm, Manufacturer Part Number=10118194-0001LF, Mount="Surface Mount,Horizontal", Number of Contacts=5, Number of Ports=1, Number of Terminals=5, Orientation="Right Angle", Packaging="Tape and Reel", Pitch=0.65mm, Pricing 1="1=0.43, 10=0.405, 25=0.3648, 50=0.3242, 100=0.3107, 250=0.28368, 500=0.27016 (USD)", Radiation Hardening=No, Stock 1=35943, Supplier 1=Digi-Key, Termination=Solder
J25: "CONN D-SUB RCPT 9POS R/A SOLDER", Color=Black, Current Rating=3A, Flammability Rating="UL94 V-0", Manufacturer=Assmann, Max Operating Temperature=105°C, Min Operating Temperature=-55°C, Supplier Part Number 1=AE10924-ND, Voltage Rating=250V, Category="D-Sub Connectors", ComponentLink1Description=http://www.assmann-wsw.com/fileadmin/datasheets/ASS_4888_CO.pdf?src-supplier=Digi-Key, ComponentLink1URL=http://www.assmann-wsw.com/fileadmin/datasheets/ASS_4888_CO.pdf?src-supplier=Digi-Key, Connector Type=D-Sub,Receptacle,Signal, Contact Material="Copper Alloy", Contact Plating=Gold, Housing Material=PBT, Lead Free="Lead Free", Manufacturer Part Number="A-DF 09 A/KG-T4S", Mount="Through Hole", Number of Pins=9, Number of Positions=9, Number of Rows=2, Packaging=Tray, Pricing 1="1=0.79000, 10=0.74200, 25=0.66800, 50=0.59380, 100=0.56910, 250=0.51964, 500=0.49490, 1000=0.40829, 2500=0.37118 (USD)", RoHS=Yes, Stock 1=19005, Supplier 1=Digi-Key, Termination=Solder
L1: library part BSCH001005052N2SCP, "FIXED IND 2.2NH 400MA 120 MOHM", Manufacturer=Chilisin, Supplier Part Number 1=2184-BSCH001005052N2SCPCT-ND, Manufacturer Part Number=BSCH001005052N2SCP, Pricing 1="1=0.10000, 10=0.01800, 25=0.01600, 50=0.01420, 100=0.01210, 250=0.01072, 500=0.00982, 1000=0.00839, 2500=0.00750 (USD)", RoHS=Yes, Stock 1=6911, Supplier 1=Digi-Key
L2 L4: library part LQH44PN470MJ0L, "1515 Inductors (SMD) ROHS", DC Resistance (DCR)=1.014O, Manufacturer="Murata Electronics", Package=1515, Rated Current=300mA, Tolerance=±20%, Inductance=47uH
L3 L7: library part NRS6045T220MMGK, "IND SMD 22uH 1.6A 20%, T&R", Case/Package=Nonstandard, Current Rating=1.6A, DC Resistance (DCR)=139.1mR, Inductance Tolerance=20%, Manufacturer="Taiyo Yuden", Max DC Current=2A, Max Operating Temperature=125°C, Min Operating Temperature=-25°C, Package Quantity=1500, Resistor Type=Wirewound, Self Resonant Frequency=7MHz, Supplier Part Number 1=587-2952-1-ND, Test Frequency=100kHz, Category="Fixed Inductors", ComponentLink1Description=https://datasheet.ciiva.com/25607/0900766b810b3cd2-25607073.pdf?src-supplier=RSComponents, ComponentLink1URL=https://datasheet.ciiva.com/25607/0900766b810b3cd2-25607073.pdf?src-supplier=RSComponents, ComponentLink2Description=https://datasheet.ciiva.com/1044/nrs6045t220mmgk-ss-1044019.pdf?src-supplier=Digi-Key, ComponentLink2URL=https://datasheet.ciiva.com/1044/nrs6045t220mmgk-ss-1044019.pdf?src-supplier=Digi-Key, ComponentLink3Description=https://datasheet.ciiva.com/8500/nrs6045t220mmgk-ss-8500556.pdf?src-supplier=Avnet, ComponentLink3URL=https://datasheet.ciiva.com/8500/nrs6045t220mmgk-ss-8500556.pdf?src-supplier=Avnet, ComponentLink4Description=https://datasheet.ciiva.com/4958/wound04-e-4958152.pdf?src-supplier=Mouser, ComponentLink4URL=https://datasheet.ciiva.com/4958/wound04-e-4958152.pdf?src-supplier=Mouser, ComponentLink5Description=https://datasheet.ciiva.com/22710/1909430-22710364.pdf?src-supplier=Element14, ComponentLink5URL=https://datasheet.ciiva.com/22710/1909430-22710364.pdf?src-supplier=Element14, Core Material=Ferrite, Depth=6.2mm, Halogen Free="Halogen Free", Height=4.5mm, Height - Seated (Max)=0.177inch, Inductance=22uH, Lead Free="Lead Free", Lead Pitch=4.7mm, Length=6mm, Manufacturer Part Number=NRS6045T220MMGK, Mount="Surface Mount", Number of Pins=2, Packaging="Tape and Reel", Pricing 1="1=0.41000, 10=0.36500, 25=0.31920, 50=0.27360, 100=0.25080, 250=0.22796, 500=0.21430 (USD)", Radiation Hardening=No, REACH SVHC=Unknown, RMS Current (Irms)=1.6A, RoHS=Yes, RoHS Compliant=Yes, Saturation Current=2A, Series=NRS, Shielding=Shielded, Stock 1=13300, Supplier 1=Digi-Key, Termination=SMD/SMT, Tolerance=20%, Width=0.236inch
L5: library part LQH32PN1R0NNCL, "FIXED IND 1UH 2.5A 43.2 MOHM SMD", Case/Package=1210, Case Code (Metric)=3225, Current Rating=2.5A, DC Resistance (DCR)=43.2mR, Inductance Tolerance=30%, Manufacturer=Murata, Max DC Current=1.75A, Max Operating Temperature=85°C, Min Operating Temperature=-40°C, Package Quantity=2000, Resistor Type=Wirewound, Saturation Current=3A, Self Resonant Frequency=100MHz, Supplier Part Number 1=81-LQH32PN1R0NNCL, Test Frequency=1MHz, Case Code (Imperial)=1210, Category="Fixed Inductors", ComponentLink1Description=https://datasheet.ciiva.com/8002/1668059-8002720.pdf?src-supplier=Element14, ComponentLink1URL=https://datasheet.ciiva.com/8002/1668059-8002720.pdf?src-supplier=Element14, ComponentLink2Description=https://datasheet.ciiva.com/29691/o05e-29691893.pdf?src-supplier=Digi-Key, ComponentLink2URL=https://datasheet.ciiva.com/29691/o05e-29691893.pdf?src-supplier=Digi-Key, Core Material=Ferrite, Height=2mm, Height - Seated (Max)=0.086inch, Inductance=1uH, Lead Free="Lead Free", Length=0.126inch, Manufacturer Part Number=LQH32PN1R0NNCL, Mount="Surface Mount", Packaging="Tape and Reel", Pricing 1="1=0.48000, 10=0.33500, 50=0.33500, 100=0.28700, 1000=0.20100, 10000=0.19400 (USD)", REACH SVHC="No SVHC", RoHS=Yes, RoHS Compliant=Yes, Series=LQH32PN_NC, Shielding=Shielded, Stock 1=228, Supplier 1=Mouser, Termination=SMD/SMT, Tolerance=30%, Weight=0.000564oz, Width=2.5mm
L6: library part 74437324022, "FIXED IND 2.2UH 3.25A 61 MOHM", Case/Package=Nonstandard, Current Rating=3.25A, DC Resistance (DCR)=61mR, Frequency=49MHz, Inductance Tolerance=20%, Manufacturer="Wurth Electronics", Max Operating Temperature=125°C, Min Operating Temperature=-40°C, Package Quantity=3000, Resistor Type=Wirewound, Saturation Current=6.5A, Supplier Part Number 1=732-3331-1-ND, Test Frequency=100kHz, Category="Fixed Inductors", ComponentLink1Description=https://datasheet.ciiva.com/1052/74437324022-1052161.pdf?src-supplier=Digi-Key, ComponentLink1URL=https://datasheet.ciiva.com/1052/74437324022-1052161.pdf?src-supplier=Digi-Key, ComponentLink2Description=https://datasheet.ciiva.com/4961/74437324022-83042-4961251.pdf?src-supplier=Mouser, ComponentLink2URL=https://datasheet.ciiva.com/4961/74437324022-83042-4961251.pdf?src-supplier=Mouser, ComponentLink3Description=https://datasheet.ciiva.com/7892/1735824-7892719.pdf?src-supplier=Element14, ComponentLink3URL=https://datasheet.ciiva.com/7892/1735824-7892719.pdf?src-supplier=Element14, ComponentLink4Description=https://datasheet.ciiva.com/25608/0900766b810c01e6-25608143.pdf?src-supplier=RSComponents, ComponentLink4URL=https://datasheet.ciiva.com/25608/0900766b810c01e6-25608143.pdf?src-supplier=RSComponents, ComponentLink5Description=https://datasheet.ciiva.com/1052/74437324022-1052162.pdf?src-supplier=Digi-Key, ComponentLink5URL=https://datasheet.ciiva.com/1052/74437324022-1052162.pdf?src-supplier=Digi-Key, ComponentLink6Description=https://datasheet.ciiva.com/1052/74437324022-1052163.pdf?src-supplier=Digi-Key, ComponentLink6URL=https://datasheet.ciiva.com/1052/74437324022-1052163.pdf?src-supplier=Digi-Key, ComponentLink7Description=https://datasheet.ciiva.com/48691/001087560-da-01-ml-we-lhmi-smd-speicherdrossel-744373-de-en-48691628.pdf?src-supplier=Conrad, ComponentLink7URL=https://datasheet.ciiva.com/48691/001087560-da-01-ml-we-lhmi-smd-speicherdrossel-744373-de-en-48691628.pdf?src-supplier=Conrad, Core Material=Ferrite,Composite, Depth=4.06mm, Height=1.8mm, Height - Seated (Max)=0.079inch, Inductance=2.2uH, Length=4.45mm, Manufacturer Part Number=74437324022, Max DC Current=3.25A, Mount="Surface Mount", Packaging="Tape and Reel", Pricing 1="1=2.20000, 10=2.15000, 50=1.97100, 100=1.88200, 500=1.79200, 1000=1.70201 (USD)", REACH SVHC=Unknown, RMS Current (Irms)=3.25A, RoHS=Yes, RoHS Compliant=Yes, Self Resonant Frequency=49MHz, Series=WE-LHMI, Series Resistance=61mR, Shielding=Shielded, Stock 1=5747, Supplier 1=Digi-Key, Termination=SMD/SMT, Tolerance=20%, Width=4.06mm
L8: library part CBC3225T330KR, "IND SMD 33 H 20% 500mA Idc", Case Code (Imperial)=1210, Case Code (Metric)=3225, Current Rating=570mA, DC Resistance (DCR)=533mR, Inductance Tolerance=10%, Manufacturer="Taiyo Yuden", Max Operating Temperature=105°C, Min Operating Temperature=-40°C, Package Quantity=1000, Resistor Type=Wirewound, Saturation Current=500mA, Self Resonant Frequency=13MHz, Supplier Part Number 1=587-3068-1-ND, Test Frequency=100kHz, Case/Package=1210, Category="Fixed Inductors", ComponentLink1Description=https://datasheet.ciiva.com/6701/cbc3225t330kr-ss-6701095.pdf?src-supplier=Digi-Key, ComponentLink1URL=https://datasheet.ciiva.com/6701/cbc3225t330kr-ss-6701095.pdf?src-supplier=Digi-Key, ComponentLink2Description=https://datasheet.ciiva.com/26871/getdatasheetpartid-639195-26871179.pdf?src-supplier=Verical, ComponentLink2URL=https://datasheet.ciiva.com/26871/getdatasheetpartid-639195-26871179.pdf?src-supplier=Verical, ComponentLink3Description=https://datasheet.ciiva.com/25607/0900766b810b3b0a-25607935.pdf?src-supplier=RSComponents, ComponentLink3URL=https://datasheet.ciiva.com/25607/0900766b810b3b0a-25607935.pdf?src-supplier=RSComponents, Core Material=Ferrite, DC Current=570mA, Depth=2.7mm, Halogen Free="Halogen Free", Height=2.5mm, Height - Seated (Max)=0.106inch, Inductance=33uH, Lead Free="Lead Free", Length=3.2mm, Manufacturer Part Number=CBC3225T330KR, Max DC Current=570mA, Military Standard=Not, Mount="Surface Mount", Packaging="Tape and Reel", Pricing 1="1=0.30000, 10=0.26800, 25=0.23480, 50=0.20120, 100=0.18450, 250=0.16776, 500=0.15768 (USD)", Radiation Hardening=No, REACH SVHC=Unknown, RoHS=Yes, RoHS Compliant=Yes, Series=CBC, Shielding=Unshielded, Stock 1=821, Supplier 1=Digi-Key, Termination=SMD/SMT, Tolerance=10%, Width=0.098inch
LED1 LED2 LED3: library part APHHS1005QBC/D, "LED BLUE CLEAR CHIP SMD 0402", Case Code (Imperial)=0402, Case Code (Metric)=1005, Colour=Blue, Forward Current=20mA, Forward Voltage=3.3V, Lens Colour=Colorless, Manufacturer=Kingbright, Max Operating Temperature=85°C, Min Operating Temperature=-40°C, Package Quantity=2000, Power Rating=120mW, Supplier Part Number 1=754-1504-1-ND, Case/Package=0402, ComponentLink1Description=http://www.mouser.com/ds/2/216/APHHS1005QBC-D-54846.pdf, ComponentLink1URL=http://www.mouser.com/ds/2/216/APHHS1005QBC-D-54846.pdf, ComponentLink2Description=http://www.kingbrightusa.com/images/catalog/SPEC/APHHS1005QBC-D.pdf, ComponentLink2URL=http://www.kingbrightusa.com/images/catalog/SPEC/APHHS1005QBC-D.pdf, Dominant Wavelength=465nm, Height=0.6mm, Illumination Colour=Blue, Lead Free="Lead Free", Length=1mm, Lens Style=Clear, Lens Transparency=Clear, Luminous Intensity=60mcd, Manufacturer Part Number=APHHS1005QBC/D, Mount="Surface Mount", Packaging="Tape and Reel", Pricing 1="1=0.58, 10=0.42, 25=0.3432, 100=0.2746, 250=0.23168, 500=0.19734, 1000=0.15444 (USD)", Stock 1=57149, Supplier 1=Digi-Key, Test Current=20mA, Viewing Angle=120°, Width=0.5mm
LED4 LED5: library part APHHS1005QBC/D, "LED BLUE CLEAR CHIP SMD 0402", Case/Package=0402, Case Code (Metric)=1005, Colour=Blue, Forward Current=20mA, Forward Voltage=3.3V, Lens Colour=Colorless, Manufacturer=Kingbright, Max Operating Temperature=85°C, Min Operating Temperature=-40°C, Package Quantity=2000, Power Rating=120mW, Supplier Part Number 1=754-1504-1-ND, Case Code (Imperial)=0402, ComponentLink1Description=http://www.mouser.com/ds/2/216/APHHS1005QBC-D-54846.pdf, ComponentLink1URL=http://www.mouser.com/ds/2/216/APHHS1005QBC-D-54846.pdf, ComponentLink2Description=http://www.kingbrightusa.com/images/catalog/SPEC/APHHS1005QBC-D.pdf, ComponentLink2URL=http://www.kingbrightusa.com/images/catalog/SPEC/APHHS1005QBC-D.pdf, Dominant Wavelength=465nm, Height=0.6mm, Illumination Colour=Blue, Lead Free="Lead Free", Length=1mm, Lens Style=Clear, Lens Transparency=Clear, Luminous Intensity=60mcd, Manufacturer Part Number=APHHS1005QBC/D, Mount="Surface Mount", Packaging="Tape and Reel", Pricing 1="1=0.58, 10=0.42, 25=0.3432, 100=0.2746, 250=0.23168, 500=0.19734, 1000=0.15444 (USD)", Stock 1=57149, Supplier 1=Digi-Key, Test Current=20mA, Viewing Angle=120°, Width=0.5mm